# EAGLE board tiny_eagle (EAGLE 9.6.2)
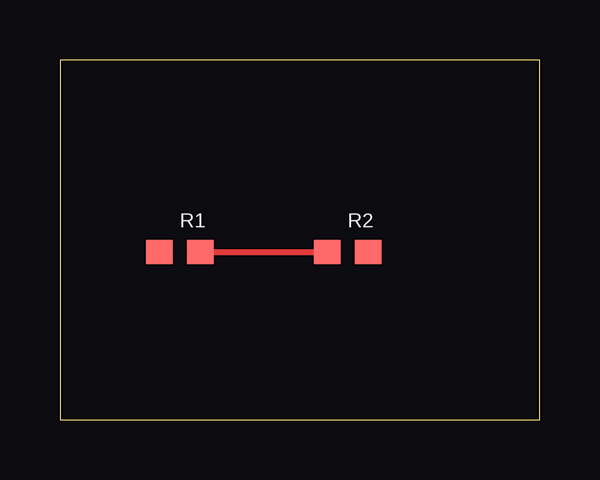
[diagram p0: board, top side]

Size 20 x 15 mm. Coordinates in mm from the lower left corner, seen from the top.
Outline: 0,0 20,0 20,15 0,15 0,0
Copper layers used: Top

## Footprints (pad centres in the part's own frame; a part is rotated, then mirrored left to right if it is on the bottom)
R0603 = smd 1.1 x 1: 1 -0.85,0; 2 0.85,0

## Placement (x,y rotation side)
R1  10k  [R0603]  5,7 0 top
R2  4k7  [R0603]  12,7 0 top

## Library data of the parts
R1 R2 = rcl

## Nets
MID: R1.2 R2.1

## Tracks (layer width: path | path; a pad name or v marks a point on that pad's centre or on a via)
MID
  Top 0.25: R1.2 R2.1